# Allegro board G_2L_LAYOUT_v1.brd
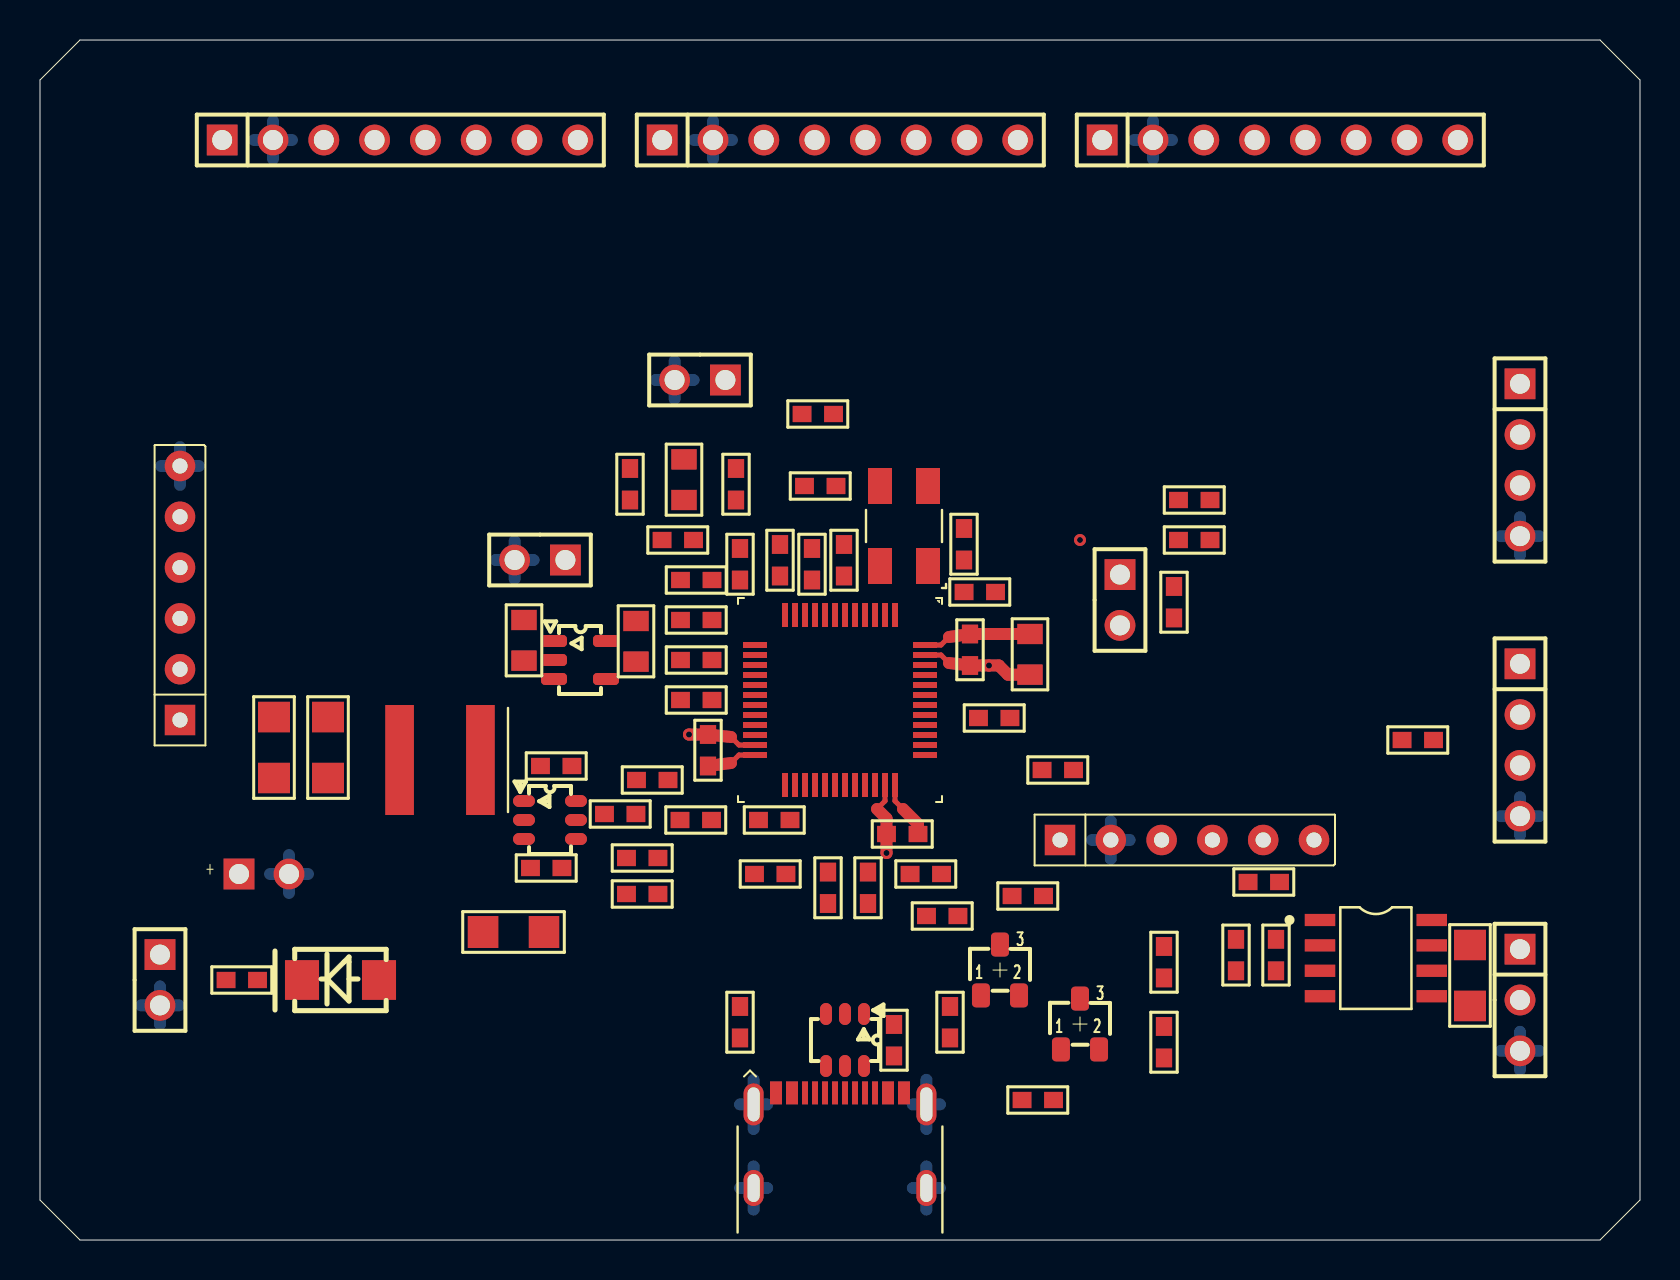
[diagram p0: board, top side]
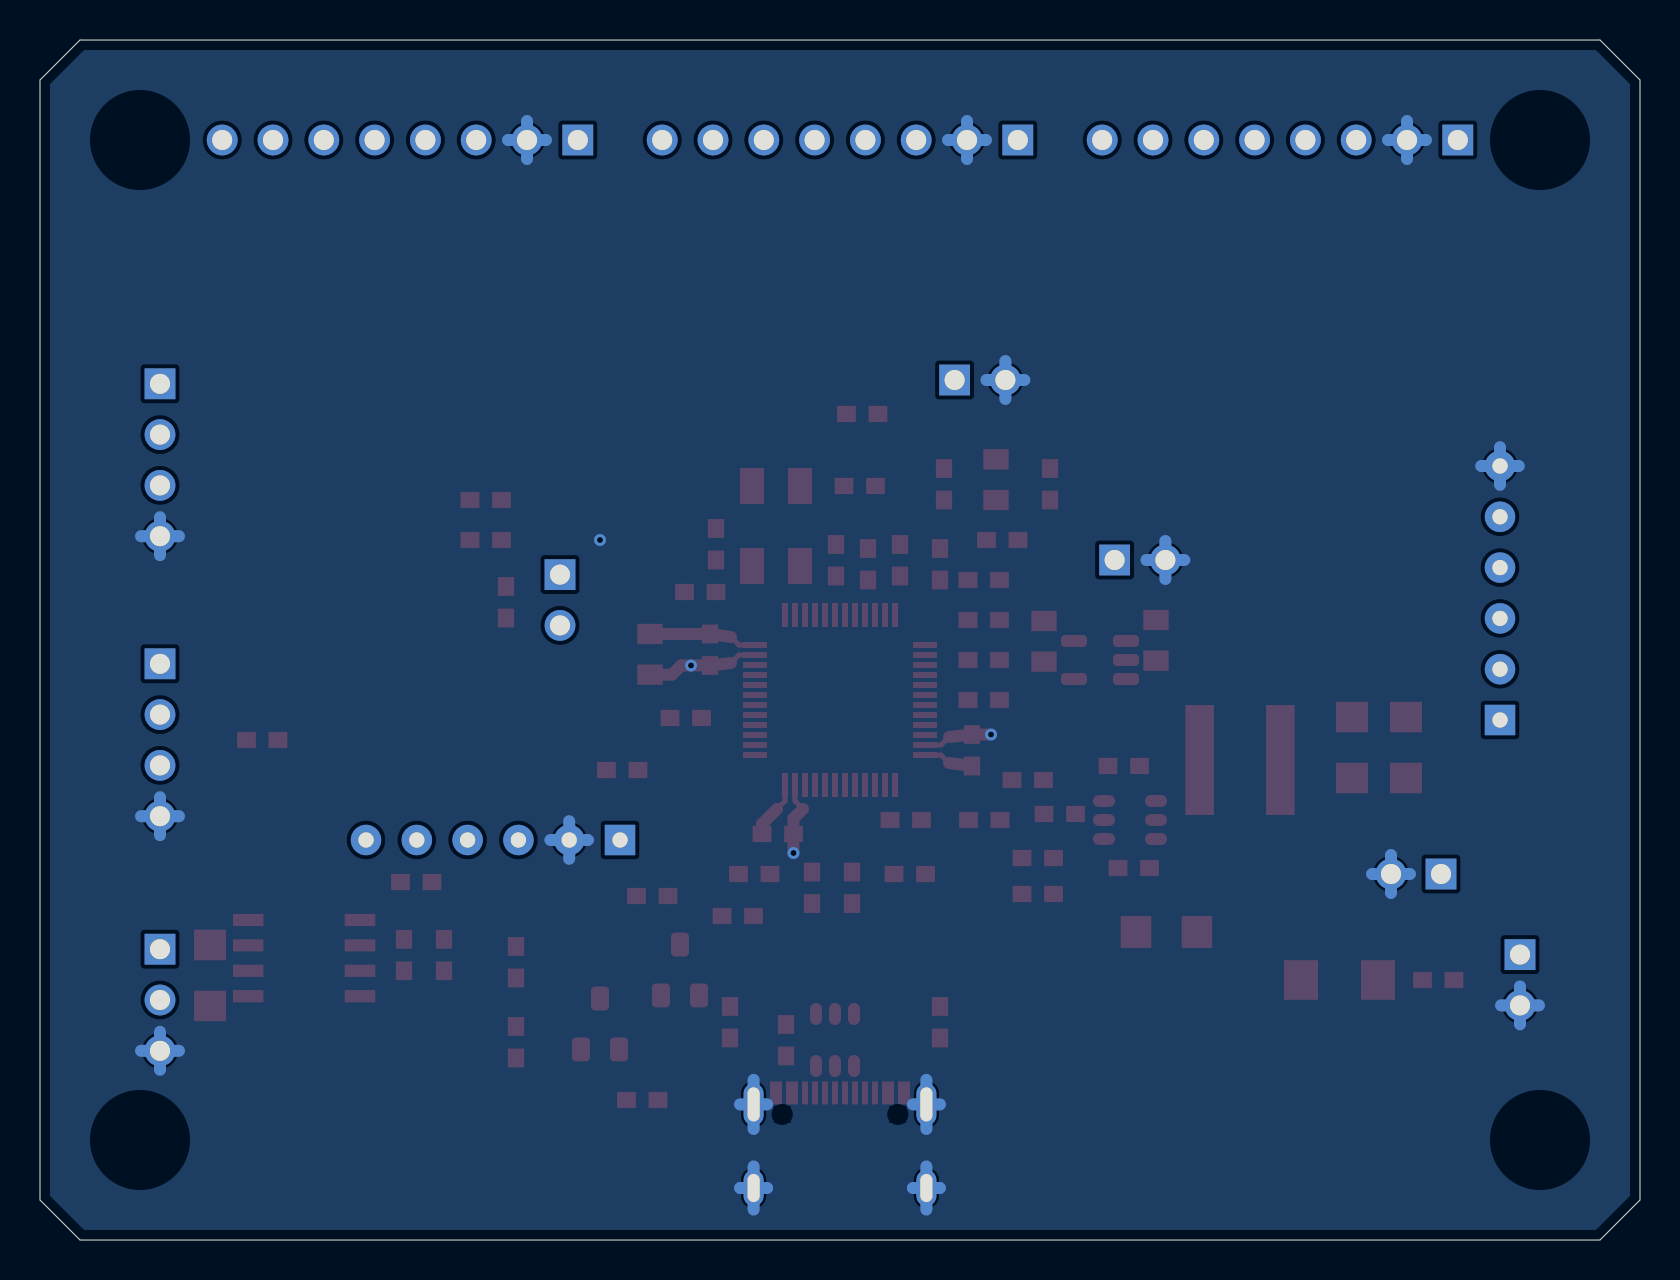
[diagram p1: board, bottom side, seen from below]

Outline 80 x 60 mm; copper layers: TOP, BOTTOM. Coordinates in mm from the lower left corner of the outline.
Outline path: 0,58 0,2 2,0 78,0 80,2 80,58 78,60 2,60 0,58

## Design rules (mm)
constraint set DEFAULT: min track width 0.203
net group G31_POWER_P: nets V3V3

## Placement (name value [footprint] x y rotation side)
C1  47uF  [DE_CAPRADIAL_6D3_P2D5]  11.2 18.3 0 top
C2  22uF  [1206]  25.2 15.4 180 top
C3  100nF  [0603]  26.2 18.6 180 top
C4  100nF  [0603]  26.7 23.7 180 top
C5  22uF  [1206]  14.4 23.1 90 top
C6  22uF  [1206]  11.7 23.1 90 top
C7  75pF  [0603]  31 17.3 180 top
C8  2.2uF  [0805]  24.2 31 270 top
C9  4.7uF  [0805]  29.8 30.95 270 top
C10  100nF  [0603]  42.7 9.1 90 top
C11  100nF  [0603]  61.8 13.36 90 top
C12  1uF  [0603]  59.8 13.36 90 top
C13  100nF  [0603]  33.4 23.6 90 top
C14  100nF  [0603]  44 20.3 180 top
C15  100nF  [0603]  46.5 30.4 270 top
C16  10uF  [0805]  49.5 30.3 270 top
C17  100nF  [0603]  46.1 32.4 0 top
C18  10nF  [0603]  37 33.1 90 top
C19  100nF  [0603]  34.8 36.9 90 top
C20  2.2uF  [0805]  32.2 37 90 top
C21  100nF  [0603]  38.6 32.9 90 top
C22  16pF  [0603]  46.2 33.9 90 top
C23  16pF  [0603]  39.9 37.7 180 top
C24  100nF  [0603]  35 32.9 90 top
D1  SS14  [DO-214AC_SMA]  15 13 90 top
F1  500mA  [0603]  9.2 13 0 top
J1  9-16V  [PIN02_2D54MM_1X2]  6 13 0 top
J2  USB-C USB2 DEVICE  [L10_GCT_USB4105_GF_A_12LAND]  40 3.67 0 top
J3  CAN  [PIN03_2D54MM_1X3]  74 12 0 top
J4  3V3  [PIN04_2D54MM_1X4]  74 25 0 top
J5  3V3  [PIN04_2D54MM_1X4]  74 39 0 top
J6  3V3  [PIN06_2D54MM_1X6]  7 26 90 top
J7  RESET_SHUNT  [PIN02_2D54MM_1X2]  33 43 270 top
J8  BOOT0_SERVICE  [PIN02_2D54MM_1X2]  54 32 0 top
J9  SWD_LOCAL_1X6  [PIN06_2D54MM_1X6]  51 20 0 top
J10  ADC_0_TO_3V0  [PIN02_2D54MM_1X2]  25 34 270 top
J11  GPIO_3V3  [PIN08_2D54MM_1X8]  18 55 90 top
J12  GPIO_3V3  [PIN08_2D54MM_1X8]  40 55 90 top
J13  GPIO_3V3  [PIN08_2D54MM_1X8]  62 55 90 top
L1  15uH +/-20%  [DE_XAL6060_2LAND]  20 24 0 top
NOREF  -  [unnamed]  75 55 0 top
NOREF#2  -  [unnamed]  5 55 0 top
NOREF#3  -  [unnamed]  75 5 0 top
NOREF#4  -  [unnamed]  5 5 0 top
Q1  2N7002  [SOT23-3]  52 10.8 0 top
Q2  DMP2035U  [SOT23-3]  48 13.5 0 top
R1  100k  [0603]  31 19.1 180 top
R2  13.5k  [0603]  29.9 21.3 180 top
R3  5.1k  [0603]  35 10 90 top
R4  5.1k  [0603]  45.5 10 90 top
R5  22R  [0603]  41.4 18.5 270 top
R6  22R  [0603]  39.4 18.5 270 top
R7  10k  [0603]  49 7 0 top
R8  1M  [0603]  56.2 9 90 top
R9  10k  [0603]  56.2 13 90 top
R10  100k  [0603]  48.5 17.2 0 top
R11  1.5k  [0603]  46 16.2 180 top
R12  0R  [0603]  43.4 18.3 0 top
R13  0R  [0603]  37.4 18.3 180 top
R14  10k  [0603]  60.3 17.9 0 top
R15  120R  [1206]  71.5 14.75 270 top
R16  33R  [0603]  37.6 21 180 top
R17  0R  [0603]  50 23.5 0 top
R18  10k  [0603]  68 25 0 top
R19  2.2k  [0603]  56.82 35 0 top
R20  2.2k  [0603]  56.82 37 0 top
R21  33R  [0603]  33.7 31 180 top
R22  33R  [0603]  33.7 27 180 top
R23  33R  [0603]  33.7 33 180 top
R24  0R  [0603]  33.7 29 180 top
R25  10k  [0603]  33.68 21 180 top
R26  0R  [0603]  29.5 36.9 90 top
R27  10k  [0603]  38 41.3 0 top
R28  10k  [0603]  48.6 26.1 180 top
R29  10k  [0603]  31.5 23 180 top
R30  1k  [0603]  56.7 31 90 top
R31  0R  [0603]  40.2 33.1 90 top
R32  1k  [0603]  31 35 0 top
U1  STM32F103C8T6  [L09_STM32F103C8_LQFP48]  40 27 270 top
U2  TPS54202  [SOT23-6]  25.5 21 270 top
U3  TLV75533P  [SOT23-5]  27 29 0 top
U4  USBLC6-2SC6  [SOT23-6]  40.25 10 180 top
U5  TCAN332  [SO8]  64 16 0 top
Y1  8MHz  [DE_ABM3B_5032]  43.2 35.7 90 top

## Library data of the parts
C1 = DE_CAP_POL
C2 C5 C6 = DE_CAP1206
C3 C4 C7 C10-C15 C17-C19 C21-C24 = DE_CAP
C8 C9 C16 C20 = DE_CAP0805
D1 = DE_SS14_E3_61T
F1 = DE_FUSE
J1 J7 J8 J10 = DE_HEADER2
J2 = DE_USB4105_GF_A
J3 = DE_HEADER3
J4 J5 = DE_HEADER4
J6 J9 = DE_HEADER6
J11-J13 = DE_HEADER8
L1 = DE_XAL6060_153MEC
Q1 = DE_2N7002
Q2 = DE_DMP2035U_7
R1-R14 R16-R32 = DE_RES
R15 = DE_RES1206
U1 = DE_STM32F103C8T6
U2 = DE_TPS54202DDCR
U3 = DE_TLV75533PDBVR
U4 = DE_USBLC6_2SC6
U5 = DE_TCAN332DR
Y1 = DE_XTAL_ABM3B

## Footprints (pads in the part's own frame, mm; a bottom-side part is the same pattern mirrored in y, then rotated)
0603
  rect 0.94x0.813 smd: 1(0.102,0) 2(1.676,0)
0805
  rect 1.016x1.27 smd: 1(0,0) 2(2.032,0)
1206
  rect 1.524x1.6 smd: 1(0,0) 2(3.048,0)
DE_ABM3B_5032
  rect 1.8x1.2 smd: 1(-2,-1.2) 2(2,-1.2) 3(2,1.2) 4(-2,1.2)
DE_CAPRADIAL_6D3_P2D5
  rect 1.54x1.54 hole 1: 1(-1.25,0)
  round 1.54 hole 1: 2(1.25,0)
DE_XAL6060_2LAND
  rect 1.43x5.5 smd: 1(2.02,0) 2(-2.02,0)
DO-214AC_SMA
  rect 1.981x1.702 smd: 1(0,-1.95) 2(0,1.9)
L09_STM32F103C8_LQFP48
  rect 1.2x0.3 smd: 1(-4.25,2.75) 2(-4.25,2.25) 3(-4.25,1.75) 4(-4.25,1.25) 5(-4.25,0.75) 6(-4.25,0.25) 7(-4.25,-0.25) 8(-4.25,-0.75) 9(-4.25,-1.25) 10(-4.25,-1.75) 11(-4.25,-2.25) 12(-4.25,-2.75) 25(4.25,-2.75) 26(4.25,-2.25) 27(4.25,-1.75) 28(4.25,-1.25) 29(4.25,-0.75) 30(4.25,-0.25) 31(4.25,0.25) 32(4.25,0.75) 33(4.25,1.25) 34(4.25,1.75) 35(4.25,2.25) 36(4.25,2.75)
  rect 0.3x1.2 smd: 13(-2.75,-4.25) 14(-2.25,-4.25) 15(-1.75,-4.25) 16(-1.25,-4.25) 17(-0.75,-4.25) 18(-0.25,-4.25) 19(0.25,-4.25) 20(0.75,-4.25) 21(1.25,-4.25) 22(1.75,-4.25) 23(2.25,-4.25) 24(2.75,-4.25) 37(2.75,4.25) 38(2.25,4.25) 39(1.75,4.25) 40(1.25,4.25) 41(0.75,4.25) 42(0.25,4.25) 43(-0.25,4.25) 44(-0.75,4.25) 45(-1.25,4.25) 46(-1.75,4.25) 47(-2.25,4.25) 48(-2.75,4.25)
L10_GCT_USB4105_GF_A_12LAND
  round 0 hole 0.65 unplated: (-2.89,2.605) (2.89,2.605)
  rect 0.6x1.15 smd: A1_B12(-3.2,3.68) A4_B9(-2.4,3.68) B1_A12(3.2,3.68) B4_A9(2.4,3.68)
  rect 0.3x1.15 smd: A5(-1.25,3.68) A6(-0.25,3.68) A7(0.25,3.68) A8(1.25,3.68) B5(1.75,3.68) B6(0.75,3.68) B7(-0.75,3.68) B8(-1.75,3.68)
  oval 1x2.1 hole 0.6x1.7: SH1(-4.32,3.105) SH2(4.32,3.105)
  oval 1x1.8 hole 0.6x1.4: SH3(-4.32,-1.075) SH4(4.32,-1.075)
PIN02_2D54MM_1X2
  rect 1.54x1.54 hole 1: 1(0,1.27)
  round 1.54 hole 1: 2(0,-1.27)
PIN03_2D54MM_1X3
  rect 1.54x1.54 hole 1: 1(0,2.54)
  round 1.54 hole 1: 2(0,0) 3(0,-2.54)
PIN04_2D54MM_1X4
  rect 1.54x1.54 hole 1: 1(0,3.81)
  round 1.54 hole 1: 2(0,1.27) 3(0,-1.27) 4(0,-3.81)
PIN06_2D54MM_1X6
  rect 1.524x1.524 hole 0.762: 1(0,0)
  round 1.524 hole 0.762: 2(2.54,0) 3(5.08,0) 4(7.62,0) 5(10.16,0) 6(12.7,0)
PIN08_2D54MM_1X8
  rect 1.54x1.54 hole 1: 1(0,8.89)
  round 1.54 hole 1: 2(0,6.35) 3(0,3.81) 4(0,1.27) 5(0,-1.27) 6(0,-3.81) 7(0,-6.35) 8(0,-8.89)
SO8
  rect 1.524x0.61 smd: 1(0,0) 2(0,-1.27) 3(0,-2.54) 4(0,-3.81) 5(5.588,-3.81) 6(5.588,-2.54) 7(5.588,-1.27) 8(5.588,0)
SOT23-3
  rrect 0.9x1.2 smd: 1(-0.953,-1.272) 2(0.953,-1.272) 3(0,1.272)
SOT23-5
  rrect 1.3x0.6 smd: 1(-1.3,0.95) 2(-1.3,0) 3(-1.3,-0.95) 4(1.3,-0.95) 5(1.3,0.95)
SOT23-6
  oval 0.6x1.1 smd: 1(-0.95,-1.3) 2(0,-1.3) 3(0.95,-1.3) 4(0.95,1.3) 5(0,1.3) 6(-0.95,1.3)
unnamed
  round 0 hole 2 unplated: (0,0)

## Nets
GND: C1.2 C2.2 C3.2 C5.2 C6.2 C8.2 C9.2 C10.2 C11.2 C12.2 C13.2 C14.2 C15.2 C16.2 C17.2 C18.2 C19.2 C20.2 C21.2 C22.2 C23.2 C24.2 J1.2 J2.A1_B12 J2.B1_A12 J2.SH1 J2.SH2 J2.SH3 J2.SH4 J3.3 J4.4 J5.4 J6.6 J7.2 J9.2 J10.2 J11.2 J12.2 J13.2 Q1.2(S) R2.2 R3.2 R4.2 R8.2 R28.2 R29.2 U1.8 U1.23 U1.35 U1.47(VSS_3) U2.1 U3.2 U4.2 U5.2 Y1.2 Y1.4
V3V3: C9.1 C11.1 C12.1 C13.1 C14.1 C15.1 C16.1 C17.1 J4.1 J5.1 J6.1 J9.1 J11.1 J12.1 J13.1 Q2.2(S) R9.1 R10.1 R14.1 R18.2 R19.1 R20.1 R25.1 R26.1 R27.1 R30.1 U1.1 U1.24 U1.36 U1.48 U3.5(OUT) U5.3(VCC)
V5: C5.1 C6.1 C7.1 C8.1 L1.2 R1.1 U3.1 U3.3
VBUS_GATE: Q1.1 R7.2 R8.1
VBUS_PRESENT_N: Q1.3 R9.2 U1.18
VDDA: C18.1 C19.1 C20.1 R26.2 U1.9
VIN_FUSED: D1.2 F1.2
VIN_PROT: C1.1(P) C2.1 C3.1 D1.1(K) U2.3(VIN)
VIN_RAW: F1.1 J1.1
ADC0: C24.1 R32.2 U1.10
ADC_IN: J10.1 R32.1
BOOT0: J8.2 R28.1 U1.44
BOOT1: R29.1 U1.20
BOOT_SERVICE: J8.1 R30.2
BUCK_BOOT: C4.1 U2.6
BUCK_FB: C7.2 R1.2 R2.1 U2.4
BUCK_SW: C4.2 L1.1(SW_END) U2.2
CAN_H: J3.1 R15.1 U5.7
CAN_L: J3.2 R15.2 U5.6
CAN_RXD: R13.2 U5.4
CAN_TXD: R12.2 R14.2 U5.1
GPIO_PA1: J11.6 U1.11
GPIO_PA2: J11.7 U1.12
GPIO_PA3: J11.8 U1.13
GPIO_PA15: J13.4 U1.38
GPIO_PB1: J12.3 U1.19
GPIO_PB4: J13.5 U1.40
GPIO_PB5: J13.6 U1.41
GPIO_PB8: J13.7 U1.45
GPIO_PB9: J13.8 U1.46
GPIO_PB10: J12.4 U1.21
GPIO_PB11: J12.5 U1.22
GPIO_PB12: J12.6 U1.25
GPIO_PB13: J12.7 U1.26
GPIO_PB14: J12.8 U1.27
GPIO_PB15: J13.3 U1.28
GPIO_PC13: J11.3 U1.2
GPIO_PC14: J11.4 U1.3
GPIO_PC15: J11.5 U1.4
I2C_SCL: J5.2 R19.2 U1.42
I2C_SDA: J5.3 R20.2 U1.43
NRST: C21.1 J7.1 J9.5 R27.2 U1.7
OSC_IN: C22.1 U1.5 Y1.1
OSC_OUT: R31.1 U1.6
PA4_SPI_NSS: R23.1 R25.2 U1.14
PA5_SPI_SCK: R21.1 U1.15
PA6_SPI_MISO: R24.1 U1.16
PA7_SPI_MOSI: R22.1 U1.17
PA9_UART_TX: R16.1 U1.30
PA10_UART_RX: R17.1 U1.31
PA11_SHARED: R6.1 R13.1 U1.32
PA12_SHARED: R5.1 R12.1 U1.33
SPI_MISO: J6.4 R24.2
SPI_MOSI: J6.3 R22.2
SPI_NSS: J6.5 R23.2
SPI_SCK: J6.2 R21.2
SWCLK: J9.4 U1.37
SWDIO: J9.3 U1.34
SWO: J9.6 U1.39
UART_RX: J4.3 R17.2 R18.1
UART_TX: J4.2 R16.2
USB_ATTACH_N: Q2.1 R10.2 U1.29
USB_CC1: J2.A5 R3.1
USB_CC2: J2.B5 R4.1
USB_DM: J2.A7 J2.B7 R6.2 U4.3 U4.4
USB_DP: J2.A6 J2.B6 R5.2 R11.2 U4.1 U4.6
USB_PULLUP_SRC: Q2.3 R11.1
USB_VBUS: C10.1 J2.A4_B9 J2.B4_A9(VBUS2) R7.1 U4.5(VBUS)
XTAL_OUT: C23.1 R31.2 Y1.3(X2)

Pads without a net: J2 A8 B8; U2 5; U3 4; U5 5 8

## Via types
v1: diameter 0.6, hole 0.3, TOP to BOTTOM, 4 vias

## Routing (per net, layer and track width the routed paths; a pad name or vN(x,y) marks a point on that pad's centre or on a via; arc(x,y) is an arc through that point)
GND: length 72.9
  TOP w0.25: 34.55,25.15 34.95,24.75 U1.23 ; U1.35 42.25,21.95 41.85,21.55 ; U1.47 45.05,29.25 45.45,28.85
  TOP w0.6: v1(32.45,25.27) C13.2 34.55,25.15 ; v1(42.33,19.35) C14.2 42.33,21.07 41.85,21.55 ; 45.45,28.85 C15.2 v1(47.45,28.73) 47.94,28.73 48.4,28.27 C16.2
  BOTTOM w0.6: J6.6 7,39.64 ; J6.6 7.94,38.7 ; J6.6 7,37.76 ; J6.6 6.06,38.7 ; 43.64,2.6 J2.SH4 ; J2.SH4 45,2.6 ; J2.SH4 44.32,1.52 ; J2.SH4 44.32,3.68 ; 23.73,33.05 J10.2 ; J10.2 23.73,34.95 ; J10.2 22.78,34 ; J10.2 24.68,34 ; 52.6,20 J9.2 ; J9.2 54.48,20 ; J9.2 53.54,19.06 ; J9.2 53.54,20.94 ; J2.SH2 45,6.78 ; J2.SH2 44.32,5.55 ; J2.SH2 43.64,6.78 ; J2.SH2 44.32,8.01 ; J1.2 6.95,11.73 ; J1.2 6,12.68 ; J1.2 6,10.78 ; J1.2 5.05,11.73 ; C1.2 12.45,19.25 ; C1.2 11.5,18.3 ; C1.2 12.45,17.35 ; C1.2 13.4,18.3 ; 35.68,5.55 J2.SH1 ; J2.SH1 36.36,6.78 ; J2.SH1 35,6.78 ; J2.SH1 35.68,8.01 ; 73.05,21.19 J4.4 ; J4.4 74,22.14 ; J4.4 74,20.24 ; J4.4 74.95,21.19 ; J7.2 32.68,43 ; J7.2 31.73,43.95 ; J7.2 30.78,43 ; J7.2 31.73,42.05 ; J5.4 74,36.14 ; J5.4 74.95,35.19 ; J5.4 73.05,35.19 ; J5.4 74,34.24 ; J2.SH3 36.36,2.6 ; J2.SH3 35.68,1.52 ; J2.SH3 35,2.6 ; J2.SH3 35.68,3.68 ; 55.65,54.05 J13.2 ; J13.2 54.7,55 ; J13.2 55.65,55.95 ; J13.2 56.6,55 ; 73.05,9.46 J3.3 ; J3.3 74,10.41 ; J3.3 74.95,9.46 ; J3.3 74,8.51 ; J12.2 34.6,55 ; J12.2 33.65,54.05 ; J12.2 32.7,55 ; J12.2 33.65,55.95 ; 11.65,54.05 J11.2 ; J11.2 12.6,55 ; J11.2 11.65,55.95 ; J11.2 10.7,55
  vias: v1(52,35)
V3V3: length 10.9
  TOP w0.25: U1.48 45.05,29.75 45.45,30.15 ; U1.24 34.95,24.25 34.55,23.85 ; 43.15,21.55 42.75,21.95 U1.36
  TOP w0.6: 34.55,23.85 C13.1 ; 45.45,30.15 C15.1 C16.1 ; C14.1 43.9,20.8 43.15,21.55

## Copper pours and planes (outline as drawn; the poured copper is in the pictures)
GND on BOTTOM: 0.5,2.21 0.5,57.79 2.21,59.5 77.79,59.5 79.5,57.79 79.5,2.21 77.79,0.5 2.21,0.5

## Text on the board
PLACE_BOUND_TOP: TOP LOW PROFILE Z<=2; x10..30 y42..52 | DATUM A=(0,0); TOP +Z; UNITS mm | 80 x 60; C2 x 4; NPTH D2 @ (5,5),(75,5),(75,55),(5,55) | J2 EDGE y=0; OPENING -Y; INSERTION +Y; H<=3.46 | 80.000
